# Altium PCB MotorDriver-v1.0.PcbDoc (part 2 of 3)
Units mil, origin at the board's own origin, x right, y up, seen from the top; angles counter-clockwise.
Board outline 4842.52 x 3661.42 mil, 2 copper layers (Top Layer, Bottom Layer), stack 57 mil thick; 127 components, 90 nets, 380 pads, 96 vias.
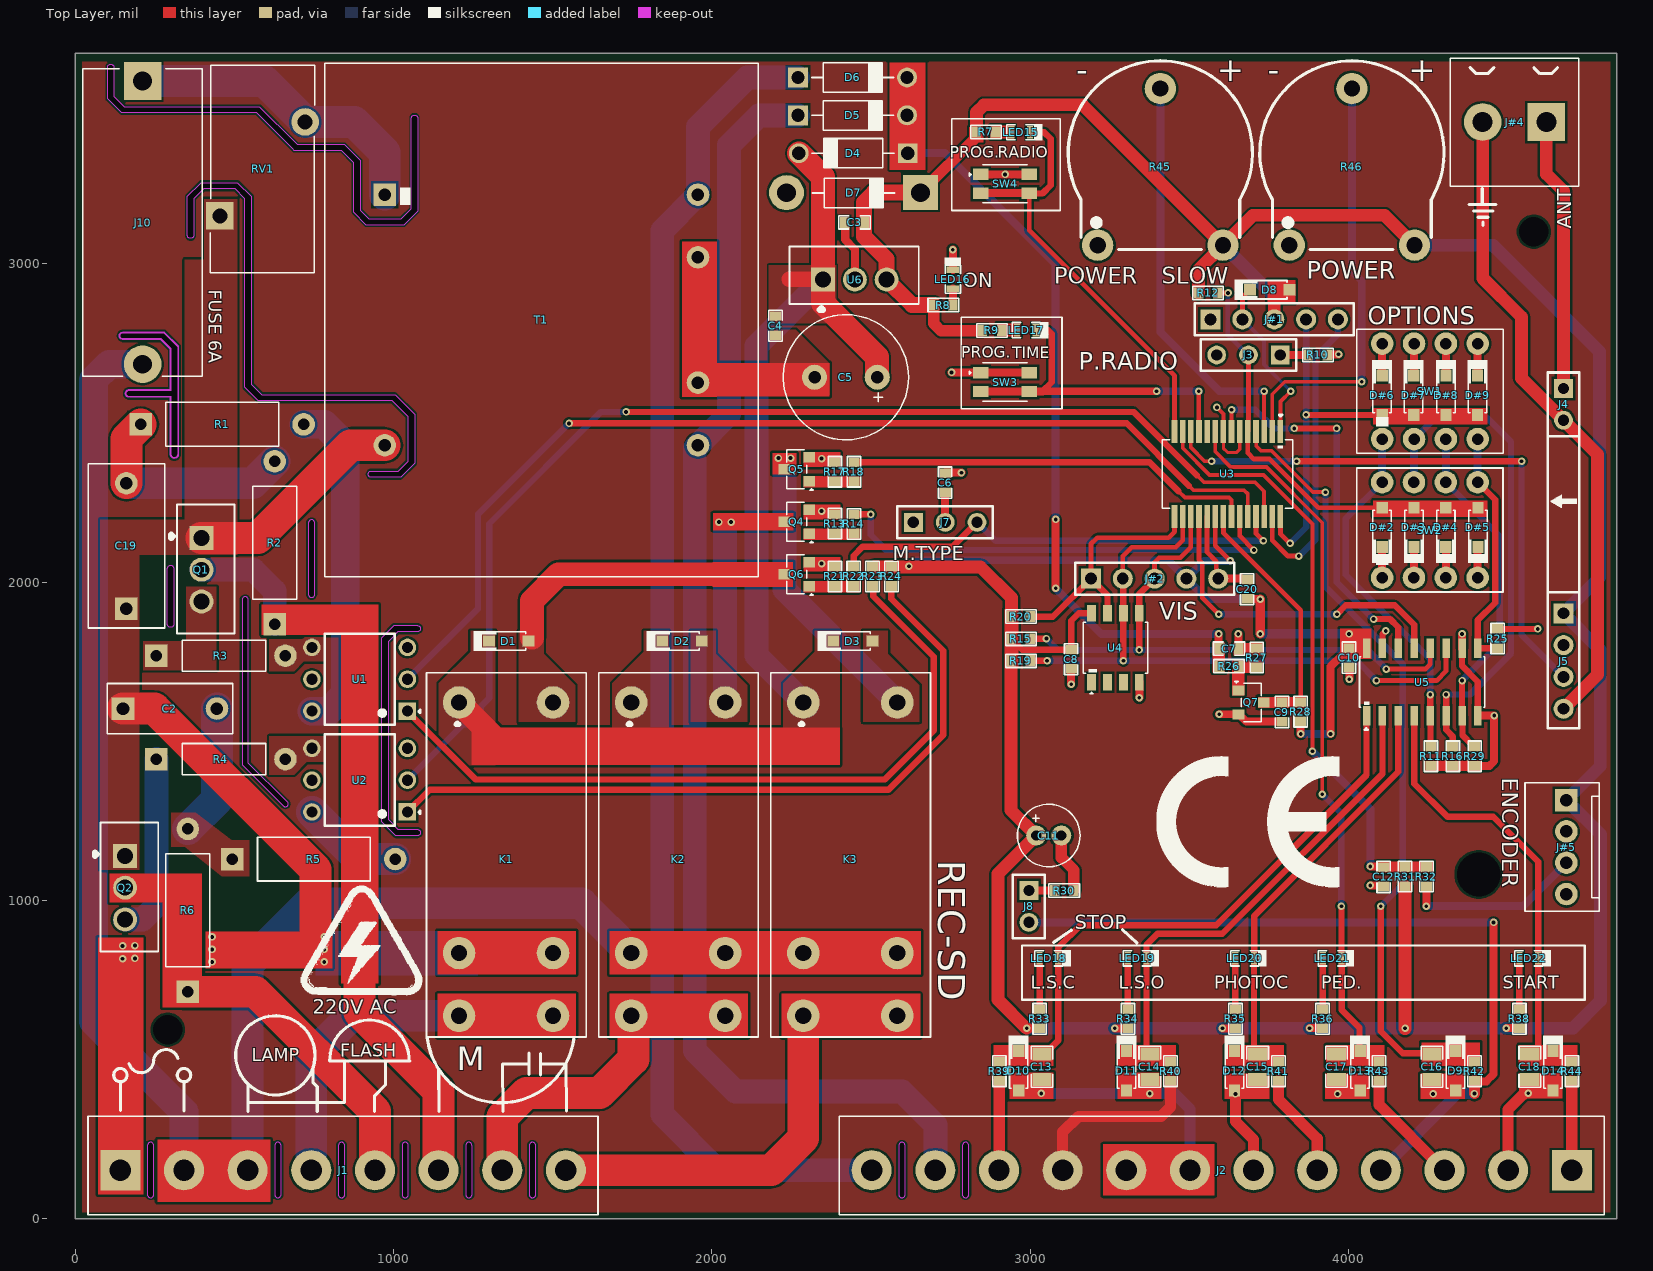
[diagram p0: Top Layer view]

## Part data (continued)
R12 R28: library part RT0603BRD0733KL, "RES SMD 33K OHM 0.1% 1/10W 0603", Case Code (Imperial)=0603, Case Code (Metric)=1608, LCSC Part Number=C705768, Manufacturer=Yageo, Max Operating Temperature=125°C, Max Power Dissipation=100mW, Min Operating Temperature=-55°C, Package Quantity=5000, Resistance=33kR, Resistor Type="Thin Film", Temperature Coefficient=25ppm/°C, Voltage Rating=75V, Voltage Rating (DC)=50V, Case/Package=0603, Category="Chip SMD Resistors", ComponentLink1Description=https://datasheet.ciiva.com/2585/pyu-rt-1-to-0-05-rohs-l-4-2585891.pdf?src-supplier=Digi-Key, ComponentLink1URL=https://datasheet.ciiva.com/2585/pyu-rt-1-to-0-05-rohs-l-4-2585891.pdf?src-supplier=Digi-Key, ComponentLink2Description=https://datasheet.ciiva.com/12810/pyu-rt-1-to-0-05-rohs-l-4-12810117.pdf?src-supplier=Mouser, ComponentLink2URL=https://datasheet.ciiva.com/12810/pyu-rt-1-to-0-05-rohs-l-4-12810117.pdf?src-supplier=Mouser, ComponentLink3Description=https://datasheet.ciiva.com/8889/pyu-rt-1-to-0-05-rohs-l-4-8889590.pdf?src-supplier=Avnet, ComponentLink3URL=https://datasheet.ciiva.com/8889/pyu-rt-1-to-0-05-rohs-l-4-8889590.pdf?src-supplier=Avnet, Construction=Rectangular, Contact Plating=Tin,Matte, Depth=0.8mm, Features="Moisture Resistant", Height=0.022inch, Lead Free="Lead Free", Length=1.6mm, Manufacturer Part Number=RT0603BRD0733KL, Military Standard=Not, Number of Terminations=2, Packaging="Tape and Reel", Power Rating=100mW, Pricing 1="1=0.30860 (USD)", Radiation Hardening=No, RoHS=Yes, RoHS Compliant=Yes, Series=RT, Size Code=0603, Stock 1=2, Supplier 1="Arrow Electronics", Supplier Part Number 1=RT0603BRD0733KL, Termination=SMD/SMT, Weight=7.1E-05oz, Width=0.031inch
R13 R17 R21: library part RC0603FR-0715KL, "RES 15K OHM 1% 1/10W 0603", Case Code (Imperial)=0603, Case Code (Metric)=1608, LCSC Part Number=C114661, Manufacturer=Yageo, Max Operating Temperature=155°C, Max Power Dissipation=100mW, Min Operating Temperature=-55°C, Package Quantity=1, Resistance Tolerance=1%, Resistor Type="Thick Film", Supplier Part Number 1=4083945, Temperature Coefficient=100ppm/°C, Voltage Rating=50V, Case/Package=0603, Category="Chip SMD Resistors", Construction=Rectangular, Depth=0.8mm, Features="Moisture Resistant", Height=0.022inch, Item Type=Resistor, Lead Free="Lead Free", Length=0.063inch, Manufacturer Part Number=RC0603FR-0715KL, Military Standard=Not, Number of Terminations=2, Packaging="Tape and Reel", Pins=2, Power Rating=100mW, Pricing 1="5000=0.00150, 50000=0.00140, 100000=0.00140, 200000=0.00140, 375000=0.00140, 625000=0.00130, 1000000=0.00130, 2000000=0.00120, 3750000=0.00120 (USD)", RoHS=Yes, RoHS Compliant=Yes, Series=RC, Stock 1=13310000, Supplier 1="Future Electronics", Termination=SMD/SMT, Tolerance=1%, Voltage Rating (DC)=50V, Width=0.031inch
R14 R15 R18 R19 R20 R22: library part RC0603FR-073K3L, "RES SMD 3.3K OHM 1% 1/10W 0603", Case/Package=0603, LCSC Part Number=C108078, Manufacturer="Yageo Phycomp", Max Operating Temperature=155°C, Min Operating Temperature=-55°C, Power Rating=100mW, Resistance=3.3kR, Supplier Part Number 1=311-3.30KHRCT-ND, Temperature Coefficient=100ppm/°C, Tolerance=1%, Voltage Rating (DC)=50V, Depth=0.8mm, Height=0.45mm, Item Type=Resistor, Lead Free="Lead Free", Length=1.6mm, Manufacturer Part Number=RC0603FR-073K3L, Mount="Surface Mount", Number of Pins=2, Packaging="Cut Tape", Pricing 1="1=0.1, 10=0.024, 100=0.0097, 1000=0.00437, 2500=0.00379 (USD)", REACH SVHC="No SVHC", Stock 1=6863000, Supplier 1=Digi-Key, Width=800um
R23 R24: library part RC0603FR-07220RL, "RES SMD 220 OHM 1% 1/10W 0603", Case Code (Imperial)=0603, Case Code (Metric)=1608, LCSC Part Number=C107696, Manufacturer=Yageo, Max Operating Temperature=155°C, Max Power Dissipation=100mW, Min Operating Temperature=-55°C, Package Quantity=1, Supplier Part Number 1=311-220HRCT-ND, Temperature Coefficient=100ppm/°C, Tolerance=1%, Voltage Rating=50V, Case/Package=0603, ComponentLink1Description=http://www.yageo.com/documents/recent/PYu-RC_Group_51_RoHS_L_10.pdf?src-supplier=Digi-Key, ComponentLink1URL=http://www.yageo.com/documents/recent/PYu-RC_Group_51_RoHS_L_10.pdf?src-supplier=Digi-Key, ComponentLink2Description=http://www.farnell.com/datasheets/1868787.pdf?src-supplier=Element14, ComponentLink2URL=http://www.farnell.com/datasheets/1868787.pdf?src-supplier=Element14, Composition="Thick Film", Depth=0.8mm, Features="Moisture Resistant", Height=0.022inch, Item Type=Resistor, Lead Free="Lead Free", Length=1.6mm, Manufacturer Part Number=RC0603FR-07220RL, Military Standard=Not, Number of Pins=2, Number of Terminations=2, Packaging="Tape and Reel", Power Rating=100mW, Pricing 1="1=0.1, 10=0.023, 100=0.0094, 1000=0.00421, 2500=0.00366 (USD)", REACH SVHC="No SVHC", Resistance=220R, Stock 1=5843995, Supplier 1=Digi-Key, Termination=SMD/SMT, Voltage Rating (DC)=50V, Width=0.031inch
R26 R27 R31: library part RC0603FR-0710KL, "RES SMD 10K Ohm 1% 1/10W 0603", Case Code (Imperial)=0603, Case Code (Metric)=1608, LCSC Part Number=C98220, Manufacturer=Yageo, Max Operating Temperature=155°C, Max Power Dissipation=100mW, Min Operating Temperature=-55°C, Resistance=10kR, Resistance Tolerance=1%, Resistor Type="Thick Film", Supplier Part Number 1=311-10.0KHRCT-ND, Temperature Coefficient=100ppm/°C, Voltage Rating=75V, Voltage Rating (DC)=50V, Case/Package=0603, Category="Chip SMD Resistors", ComponentLink1Description=https://datasheet.ciiva.com/7660/38590-7660789.pdf?src-supplier=Element14, ComponentLink1URL=https://datasheet.ciiva.com/7660/38590-7660789.pdf?src-supplier=Element14, ComponentLink2Description=https://datasheet.ciiva.com/7983/443971-7983596.pdf?src-supplier=Element14, ComponentLink2URL=https://datasheet.ciiva.com/7983/443971-7983596.pdf?src-supplier=Element14, ComponentLink3Description=https://datasheet.ciiva.com/22747/443971-22747519.pdf?src-supplier=Element14, ComponentLink3URL=https://datasheet.ciiva.com/22747/443971-22747519.pdf?src-supplier=Element14, ComponentLink4Description=https://datasheet.ciiva.com/46440/1868787-46440891.pdf?src-supplier=Element14, ComponentLink4URL=https://datasheet.ciiva.com/46440/1868787-46440891.pdf?src-supplier=Element14, ComponentLink5Description=https://datasheet.ciiva.com/7746/1738695-7746239.pdf?src-supplier=Element14, ComponentLink5URL=https://datasheet.ciiva.com/7746/1738695-7746239.pdf?src-supplier=Element14, ComponentLink6Description=https://datasheet.ciiva.com/15189/getdatasheetpartid-409289-15189591.pdf?src-supplier=Verical, ComponentLink6URL=https://datasheet.ciiva.com/15189/getdatasheetpartid-409289-15189591.pdf?src-supplier=Verical, Construction=Rectangular, Depth=0.8mm, Features="Moisture Resistant", Height=0.45mm, Item Type=Resistor, Lead Free="Lead Free", Lead Pitch=0.3mm, Length=1.6mm, Manufacturer Part Number=RC0603FR-0710KL, Military Standard=Not, Number of Pins=2, Number of Terminations=2, Packaging="Tape and Reel", Power Rating=100mW, Pricing 1="1=0.10000, 10=0.02400, 100=0.00970, 1000=0.00436, 2500=0.00378 (USD)", REACH SVHC=Unknown, RoHS=Yes, RoHS Compliant=Yes, Series=RC, Size Code=0603, Stock 1=25249139, Supplier 1=Digi-Key, Termination=SMD/SMT, Tolerance=1%, Weight=7.1E-05oz, Width=0.8mm
R30: library part RT0603BRD078K2L, "RES SMD 8.2K OHM 0.1% 1/10W 0603", Case/Package=0603, LCSC Part Number=C861589, Manufacturer=Yageo, Max Operating Temperature=155°C, Min Operating Temperature=-55°C, Package Height=0.45mm, Package Length=1.6mm, Package Style=SMTMeter, Package Width=0.8mm, Power=100mW, Rated Temperature=70°C, Resistor Type="FIXED RESISTOR", Supplier Part Number 1=1991627P, Temperature Coefficient=25ppm/°C, Tolerance=0.1%, Working Voltage=75V, Category="Chip SMD Resistors", ComponentLink1Description=https://datasheet.ciiva.com:443/pdfs/VipMasterIC/IC/YAGO/YAGO-S-A0008510989/YAGO-S-A0008510989-1.pdf?src-supplier=IHS+Markit, ComponentLink1URL=https://datasheet.ciiva.com:443/pdfs/VipMasterIC/IC/YAGO/YAGO-S-A0008510989/YAGO-S-A0008510989-1.pdf?src-supplier=IHS+Markit, ComponentLink2Description=https://datasheet.ciiva.com/12809/pyu-rt-1-to-0-05-rohs-l-4-12809820.pdf?src-supplier=Mouser, ComponentLink2URL=https://datasheet.ciiva.com/12809/pyu-rt-1-to-0-05-rohs-l-4-12809820.pdf?src-supplier=Mouser, Construction=Chip, Item Type=Resistor, Manufacturer Part Number=RT0603BRD078K2L, Mounting Technology="Surface Mount", Packaging="Tape and Reel", Pins=2, Pricing 1="100=0.21900, 250=0.20400, 500=0.19000, 1000=0.17400 (GBP)", Reach SVHC Compliant=Yes, RoHS=Yes, RoHS Compliant=Yes, Stock 1=4900, Supplier 1=Rs, Technology="THIN FILM", Termination=Wraparound
R32: library part RC0603FR-07150RL, "RES SMD 150OHM 1/10W 0603", Case Code (Imperial)=0603, Case Code (Metric)=1608, LCSC Part Number=C114608, Manufacturer=Yageo, Max Operating Temperature=155°C, Max Power Dissipation=100mW, Min Operating Temperature=-55°C, Package Quantity=5000, Resistance Tolerance=1%, Resistor Type="Thick Film", Supplier Part Number 1=311-150HRCT-ND, Temperature Coefficient=100ppm/°C, Voltage Rating=50V, Case/Package=0603, Category="Chip SMD Resistors", ComponentLink1Description=https://datasheet.ciiva.com/46412/443971-46412844.pdf?src-supplier=Element14, ComponentLink1URL=https://datasheet.ciiva.com/46412/443971-46412844.pdf?src-supplier=Element14, ComponentLink2Description=https://datasheet.ciiva.com/46440/1868787-46440893.pdf?src-supplier=Element14, ComponentLink2URL=https://datasheet.ciiva.com/46440/1868787-46440893.pdf?src-supplier=Element14, ComponentLink3Description=https://datasheet.ciiva.com/12555/rc0603-272842-12555301.pdf?src-supplier=Mouser, ComponentLink3URL=https://datasheet.ciiva.com/12555/rc0603-272842-12555301.pdf?src-supplier=Mouser, Construction=Rectangular, Depth=0.8mm, Features="Moisture Resistant", Height=0.45mm, Lead Free="Lead Free", Length=1.6mm, Manufacturer Part Number=RC0603FR-07150RL, Military Standard=Not, Number of Pins=2, Number of Terminations=2, Packaging="Tape and Reel", Power Rating=100mW, Pricing 1="1=0.10000, 10=0.02400, 100=0.00970, 1000=0.00436, 2500=0.00378 (USD)", REACH SVHC="No SVHC", Resistance=150R, RoHS=Yes, RoHS Compliant=Yes, Series=RC, Size Code=0603, Stock 1=263721, Supplier 1=Digi-Key, Termination=SMD/SMT, Tolerance=1%, Voltage Rating (DC)=50V, Width=0.8mm
R39 R40 R41 R42 R43 R44: library part RC0603FR-07100RL, "RES SMD 100 OHM 1% 1/10W 0603", Case Code (Imperial)=0603, Case Code (Metric)=1608, LCSC Part Number=C105588, Manufacturer=Yageo, Max Operating Temperature=155°C, Max Power Dissipation=100mW, Min Operating Temperature=-55°C, Resistance Tolerance=1%, Resistor Type="Thick Film", Temperature Coefficient=100ppm/°C, Voltage Rating=50V, Case/Package=0603, Category="Chip SMD Resistors", Construction=Rectangular, Depth=0.8mm, Features="Moisture Resistant", Height=0.45mm, Item Type=Resistor, Lead Free="Lead Free", Length=1.6mm, Manufacturer Part Number=RC0603FR-07100RL, Military Standard=Not, Number of Pins=2, Number of Terminations=2, Packaging="Tape and Reel", Power Rating=100mW, Pricing 1="5000=0.00300, 5000=0.00200, 5000=0.00450, 50000=0.00410, 500000=0.00230, 2500000=0.00140 (USD)", REACH SVHC=Unknown, Resistance=100R, RoHS=Yes, RoHS Compliant=Yes, Series=RC, Size Code=0603, Stock 1=3800000, Supplier 1="Arrow Electronics", Supplier Part Number 1=RC0603FR-07100RL, Technology="THICK FILM", Termination=SMD/SMT, Tolerance=1%, Voltage Rating (DC)=50V, Width=0.8mm
R45 R46: library part PT15-L-V-104(100K), "±20% 250mW 100kΩ - Variable Resistors/Potentiometers ROHS", LCSC Part Number=C5205120, Manufacturer=BOCHEN, Package=Custom, ComponentLink1Description=LCSC, ComponentLink1URL=https://www.lcsc.com/product-detail/Variable-Resistors-Potentiometers_BOCHEN-Chengdu-Guosheng-Tech-PT15-L-V-104-100K_C5205120.html, Item Type=Potentiometer, Manufacturer Part Number=PT15-L-V-104(100K)
RV1: "710V 350V 275V 387V~473V Plugin Varistors ROHS", LCSC Part Number=C137830, Manufacturer="Hongzhi Elec", Package=Plugin, ComponentLink1Description=LCSC, ComponentLink1URL=https://www.lcsc.com/product-detail/Varistors_Hongzhi-Elec-14D431K_C137830.html, Item Type=Varistor, Manufacturer Part Number=14D431K
SW1 SW2: "4Bit SPST 24V Red 25mA 3000次 Plugin DIP Switches ROHS", LCSC Part Number=C5123702, Manufacturer=kangshen, Manufacturer Part Number=208-4, Package=Plugin, ComponentLink1Description=LCSC, ComponentLink1URL=https://www.lcsc.com/product-detail/DIP-Switches_CTS-Electronic-Components-208-4_C3012341.html, Item Type="DIP Switch"
SW3 SW4: "3mm 2mm Round Button 50mA Top3.65mm SPST 12V SMD Tactile Switches", LCSC Part Number=C318893, Manufacturer=XKB, ComponentLink1Description=LCSC, ComponentLink1URL=https://lcsc.com/product-detail/Tactile-Switches_XKB-Connectivity-TS-1185EC-C-D-B_C318893.html, Manufacturer Part Number=TS-1185EC-C-D-B
T1: "Vacuum Epoxy Encapsulated,PCB mounting, Pirmary voltage: 110V/220V/230V/380.", Manufacturer=YHDC, Manufacturer Part Number=PE3817-M, ComponentLink1Description=LCSC, ComponentLink1URL=https://vi.aliexpress.com/item/32737640605.html?spm=a2g0o.productlist.main.1.9e8c53b8DhDv65&algo_pvid=dfbf5521-a82b-4f41-a663-463eb69d6f12&algo_exp_id=dfbf5521-a82b-4f41-a663-463eb69d6f12-0&pdp_npi=4%40dis%21USD%212.76%212.76%21%21%212.76%21%21%402101fb1816980403049242369e75cd%2112000034040116544%21sea%21PK%21821782294%21&curPageLogUid=ULPY5vETnG3z&gatewayAdapt=glo2vnm, Item Type=Transformer
U1: "OPTOISOLATOR 5KV TRIAC 6DIP", LCSC Part Number=C115466, Manufacturer="Vishay Lite-On", Supplier Part Number=1689685, Category=Optocouplers, ComponentLink1Description=https://datasheet.ciiva.com/11772/0900766b80de6ded-11772106.pdf?src-supplier=Rs, ComponentLink1URL=https://datasheet.ciiva.com/11772/0900766b80de6ded-11772106.pdf?src-supplier=Rs, ComponentLink2Description=https://datasheet.ciiva.com/2093/s-110-moc3020thrumoc3023series-2093015.pdf?src-supplier=Digi-Key, ComponentLink2URL=https://datasheet.ciiva.com/2093/s-110-moc3020thrumoc3023series-2093015.pdf?src-supplier=Digi-Key, Item Type=Optocoupler, Manufacturer Part Number=MOC3022, Pricing="65=0.284 (GBP)", RoHS=Yes, Stock=90, Supplier=Rs
U2: "OPTOISOLATOR 5KV TRIAC 6DIP", LCSC Part Number=C78487, Manufacturer="Vishay Lite-On", Supplier Part Number=1689692, Category=Optocouplers, ComponentLink1Description=https://datasheet.ciiva.com/15118/getdatasheetpartid-141776-15118268.pdf?src-supplier=Verical, ComponentLink1URL=https://datasheet.ciiva.com/15118/getdatasheetpartid-141776-15118268.pdf?src-supplier=Verical, ComponentLink2Description=https://datasheet.ciiva.com/11771/0900766b80de6dee-11771947.pdf?src-supplier=Rs, ComponentLink2URL=https://datasheet.ciiva.com/11771/0900766b80de6dee-11771947.pdf?src-supplier=Rs, Item Type=IC, Manufacturer Part Number=MOC3063, Pricing="65=0.362 (GBP)", RoHS=Yes, Stock=1109, Supplier=Rs
U3: "PIC PIC® 16F Microcontroller IC 8-Bit 20MHz 14KB (8K x 14) FLASH 28-SSOP", LCSC Part Number=C38185, Manufacturer=Microchip, Supplier Part Number=400390P, Category=Microcontrollers, ComponentLink1Description=https://datasheet.ciiva.com/29119/160448-da-01-en-pic-pic16f886-i-ss-29119398.pdf?src-supplier=Conrad, ComponentLink1URL=https://datasheet.ciiva.com/29119/160448-da-01-en-pic-pic16f886-i-ss-29119398.pdf?src-supplier=Conrad, ComponentLink2Description=https://datasheet.ciiva.com/3203/41291f-3203502.pdf?src-supplier=Avnet, ComponentLink2URL=https://datasheet.ciiva.com/3203/41291f-3203502.pdf?src-supplier=Avnet, Item Type=IC, Manufacturer Part Number=PIC16F886-I/SS, Pricing="10=2.52, 25=2.454, 100=2.394 (GBP)", RoHS=Yes, Stock=1762, Supplier=Rs
U4: "IC EEPROM 16KBIT I2C 1MHZ 8SOP", LCSC Part Number=C232877, Manufacturer="Fremont Micro Devices", Supplier Part Number=1219-1246-2-ND, Category=Memory, Item Type=IC, Manufacturer Part Number=FT24C16A-ESR-T, Pricing="2500=0.16918 (USD)", RoHS=No, Supplier=Digi-Key
U5: "Multiplexer 1-Element CMOS 3-ST 8-IN 16-Pin SOIC Tube", LCSC Part Number=C1547339, Manufacturer="Texas Instruments", Supplier Part Number=595-CD4512BM, Category="Integrated Circuits (ICs)", ComponentLink1Description=https://datasheet.ciiva.com/15087/getdatasheetpartid-393294-15087392.pdf?src-supplier=Verical, ComponentLink1URL=https://datasheet.ciiva.com/15087/getdatasheetpartid-393294-15087392.pdf?src-supplier=Verical, ComponentLink2Description=https://datasheet.ciiva.com/1629/cd4512b-1629722.pdf?src-supplier=Newark, ComponentLink2URL=https://datasheet.ciiva.com/1629/cd4512b-1629722.pdf?src-supplier=Newark, ComponentLink3Description=https://datasheet.ciiva.com/6619/cd4512b-6619077.pdf?src-supplier=Digi-Key, ComponentLink3URL=https://datasheet.ciiva.com/6619/cd4512b-6619077.pdf?src-supplier=Digi-Key, ComponentLink4Description=https://datasheet.ciiva.com/14285/cd4512b-mil-14285481.pdf?src-supplier=Avnet, ComponentLink4URL=https://datasheet.ciiva.com/14285/cd4512b-mil-14285481.pdf?src-supplier=Avnet, Item Type=IC, Manufacturer Part Number=CD4512BM, Pricing="1=1.21, 10=1.03, 50=1.03, 100=1.03, 120=0.789, 520=0.718, 1000=0.542, 2520=0.529, 5000=0.512, 10000=0.505, 25000=0.499 (USD)", RoHS=Yes, Stock=768, Supplier=Mouser
U6: "IC REG LINEAR 5V 1.5A TO220AB", Case/Package=TO, Dropout Voltage=2V, LCSC Part Number=C16807, Manufacturer=STMicroelectronics, Max Operating Temperature=125°C, Max Output current=1A, Max Output Voltage=5V, Max Supply Voltage=35V, Min Input Voltage=7V, Min Operating Temperature=-40°C, Output Current=1.5A, Output Voltage Accuracy=2%, Package Quantity=50, Power Supply Rejection Ratio (PSRR)=68dB, Quiescent Current=6mA, Supplier Part Number=511-L7805ABV, Accuracy=2%, Category="Voltage Regulators - Linear", ComponentLink1Description=https://datasheet.ciiva.com/1512/1696820-1512331.pdf?src-supplier=Element14, ComponentLink1URL=https://datasheet.ciiva.com/1512/1696820-1512331.pdf?src-supplier=Element14, ComponentLink2Description=https://datasheet.ciiva.com/2052/cd00000444-2052290.pdf?src-supplier=Digi-Key, ComponentLink2URL=https://datasheet.ciiva.com/2052/cd00000444-2052290.pdf?src-supplier=Digi-Key, ComponentLink3Description=https://datasheet.ciiva.com/1511/1805459-1511907.pdf?src-supplier=Element14, ComponentLink3URL=https://datasheet.ciiva.com/1511/1805459-1511907.pdf?src-supplier=Element14, Height=9.15mm, Item Type=Regulator, Lead Free="Lead Free", Length=10.4mm, Manufacturer Part Number=L7805ABV, Min Output Voltage=5V, Mounting Technology="Through Hole", Nominal Output Voltage=5V, Number of Outputs=1, Number of Regulators=1, Output Configuration=Positive, Output Type=Fixed, Output Voltage=5V, Packaging=Rail/Tube, Pins=3, Polarity=Positive, Pricing="1=0.75, 10=0.626, 50=0.626, 100=0.511, 1000=0.313, 10000=0.276 (USD)", Radiation Hardening=No, Reach SVHC Compliant=No, RoHS=Yes, RoHS Compliant=Yes, Series=-, Stock=15048, Supplier=Mouser, Width=4.6mm

## Free pads (board coordinates)
  round 0 hole 92.52 unplated: MH(290,594) MH(4582.68,3101.45)
  round 0 hole 137.8 unplated: MH(4409.45,1081.92)

## Via types
v1: diameter 23.62, hole 11.81, Top Layer to Bottom Layer, 96 vias

## Nets (pads, with @x,y where several pads share a name; then routed paths per layer and width w, separated by ;. In a path a pad name is that pad's centre, name@x,y a point inside that pad or via, vN(x,y) a via of type N, cw(c..) or ccw(c..) an arc to the next point about the centre after c; other vN are vias at no path point)
5V: C3.1 C8.1 C10.2 C11.1 C20.2 D7.1 D8.1 J5.1 J#1.3 J#2.4 J#5.1 R7.1 R8.1 R9.1 R12.2 R15.2 R19.2 R20.2 R23.2 R24.2 R28.2 R31.1 R33.1 R34.1 R35.1 R36.1 R38.1 R45.3 R46.3 U3.20 U4.8 U5.16 U6.3 | length 13425.1
  Top Layer w15: U3.20@3581.61,2206.14 3581.61,2114.39 v1(3629,2067)
  Top Layer w20: R9.1@2849,2790 R9.1@2850,2791 ; R19.2@2940,1752 R19.2@2941,1753 ; R15.2@2941,1822.5 R15.2@2941,1822 2941,1819.5 2946,1814.5 2949,1814.5 2975.5,1788 C8.1@3129,1788 3129,1879 3152.27,1902.27 U4.8@3193,1902.27 ; D8.1@3802.56,2911.28 3808.58,2911.28 D8.1@3815.01,2917.71
  Top Layer w25: v1(2989,598) R33.1@3030,598 ; v1(3266,598) R34.1@3307,598 ; v1(3604,598) R35.1@3645,598 ; C20.2@3683.82,1946.49 v1(3723.14,1946.49) ; v1(3850,1523) R28.2@3850,1563 ; v1(3877.99,598.52) R36.1@3918.99,598.52 ; v1(3944,1523) 3944,1735 3980.5,1771.5 3985.5,1771.5 4002,1788 C10.2@4002,1793 4002.35,1792.65 4056.65,1792.65 U5.16@4057,1792.3 ; v1(4496,598.52) R38.1@4536.48,598.52
  Top Layer w30: v1(3723.14,1837.5) v1(3723.14,1946.49) ; C10.2@4002,1793 v1@4002,1831
  Top Layer w35: D7.1@2655.63,3224 2831,3399.37 R7.1@2831,3415 ; R8.1@2697,2871 2697,2813 2720,2790 R9.1@2849,2790
  Top Layer w40: R23.2@2509,2048 R24.2@2564,2048 2844,2048 2941,1951 R20.2@2941,1892 ; R7.1@2831,3415 2831,3476.57 2854.43,3500 3164.79,3500 R45.3@3605.85,3058.94 ; R19.2@2940,1752 2940,1283 C11.1@3019,1204 2899,1084 2899,688 v1(2989,598) ; R12.2@3529,2909 3529,2982.09 R45.3@3605.85,3058.94 ; J#1.3@3767,2826 3767,2875.72 ; v1@4178,597 v1(4178,598.52) R31.1@4178,1045 ; R46.3@4207.85,3058.94 4113.79,3153 3699.91,3153 R45.3@3605.85,3058.94
  Top Layer w50: D7.1@2655.63,3224 2508,3224 2478,3194 C3.1@2478,3131 2478,3086 2549,3015 U6.3@2549,2951 2629,2871 R8.1@2697,2871
  Bottom Layer w25: v1(2619,2050) 2638,2069 3433,2069 J#2.4@3491,2011 ; v1(3629,2067) 3547,2067 J#2.4@3491,2011 ; v1(3723.14,1946.49) 3555.51,1946.49 J#2.4@3491,2011 ; v1(3850,1523) v1(3944,1523) ; J#5.1@4685,1315.28 J#5.1@4691.64,1308.64
  Bottom Layer w30: v1(3723.14,1837.5) v1(4002,1837.5)
  Bottom Layer w40: v1(2989,598) v1(3266,598) v1(3604,598) v1@3877.99,598 ; R45.3@3605.85,3058.94 3767,2897.79 J#1.3@3767,2826 ; v1(3877.99,598.52) v1(4178,598.52) v1(4496,598.52) 4705.52,598.52 4792,685 4792,1208.28 J#5.1@4691.64,1308.64 ; R46.3@4207.85,3058.94 4454.06,3058.94 4789,2724 4789,2015.26 J5.1@4676.07,1902.34 4791,1787.41 4791,1421.28 J#5.1@4685,1315.28
ANT: J4.1 J#4.1 | length 859.4
  Top Layer w40: J#4.1@4622,3446 4622,3283 4676.07,3228.93 J4.1@4676.07,2609
"Coil 1": D1.1 K1.8 Q6.3 | length 906.8
  Top Layer w75: D1.1@1434,1825.99 1434,1941 1518,2025 2191,2025
"Coil 2": D2.1 K2.8 Q4.3 | length 539.9
  Bottom Layer w75: K2.8@2041.46,1622.06 2041.46,2162
  other v1: 2022,2189 2060,2189